# Altium PCB PCBGroupie.PcbDoc
Units mm, origin at the board's own origin, x right, y up, seen from the top; angles counter-clockwise.
Board outline 81.5 x 52.25 mm, 2 copper layers (Top Layer, Bottom Layer), stack 1.57 mm thick; 33 components, 36 nets, 132 pads, 2 vias.
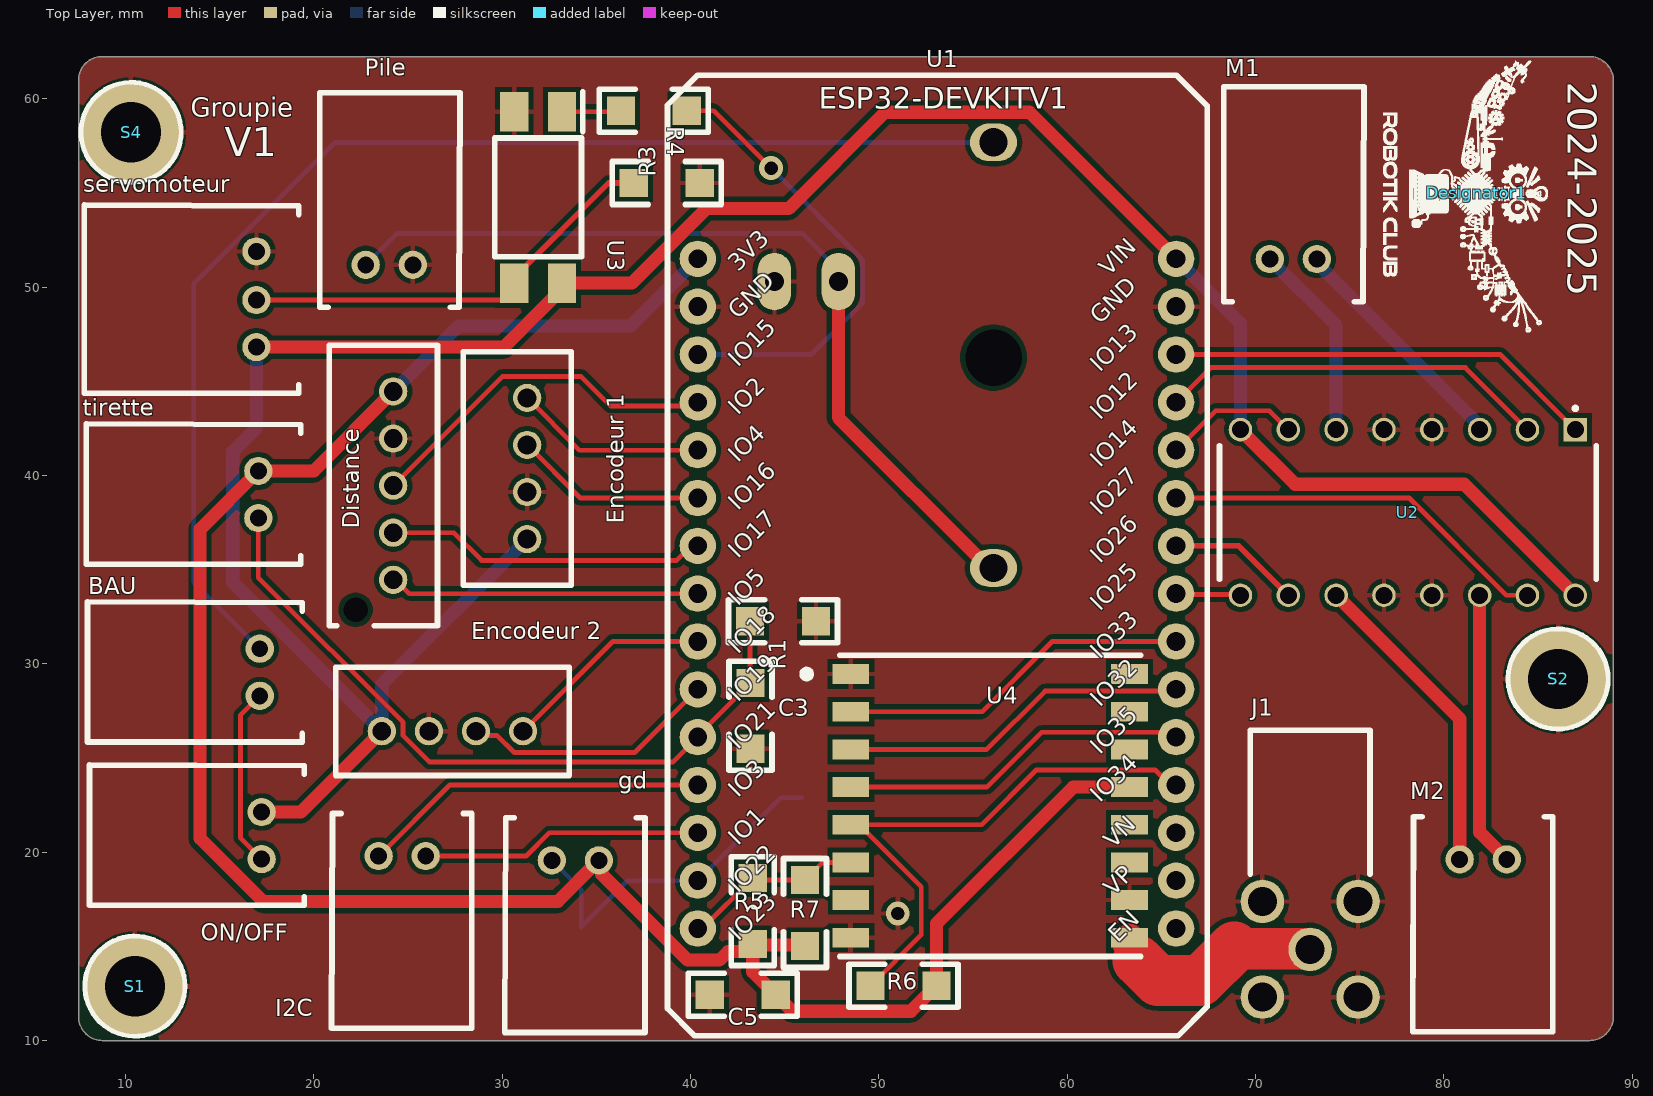
[diagram p0: Top Layer view]
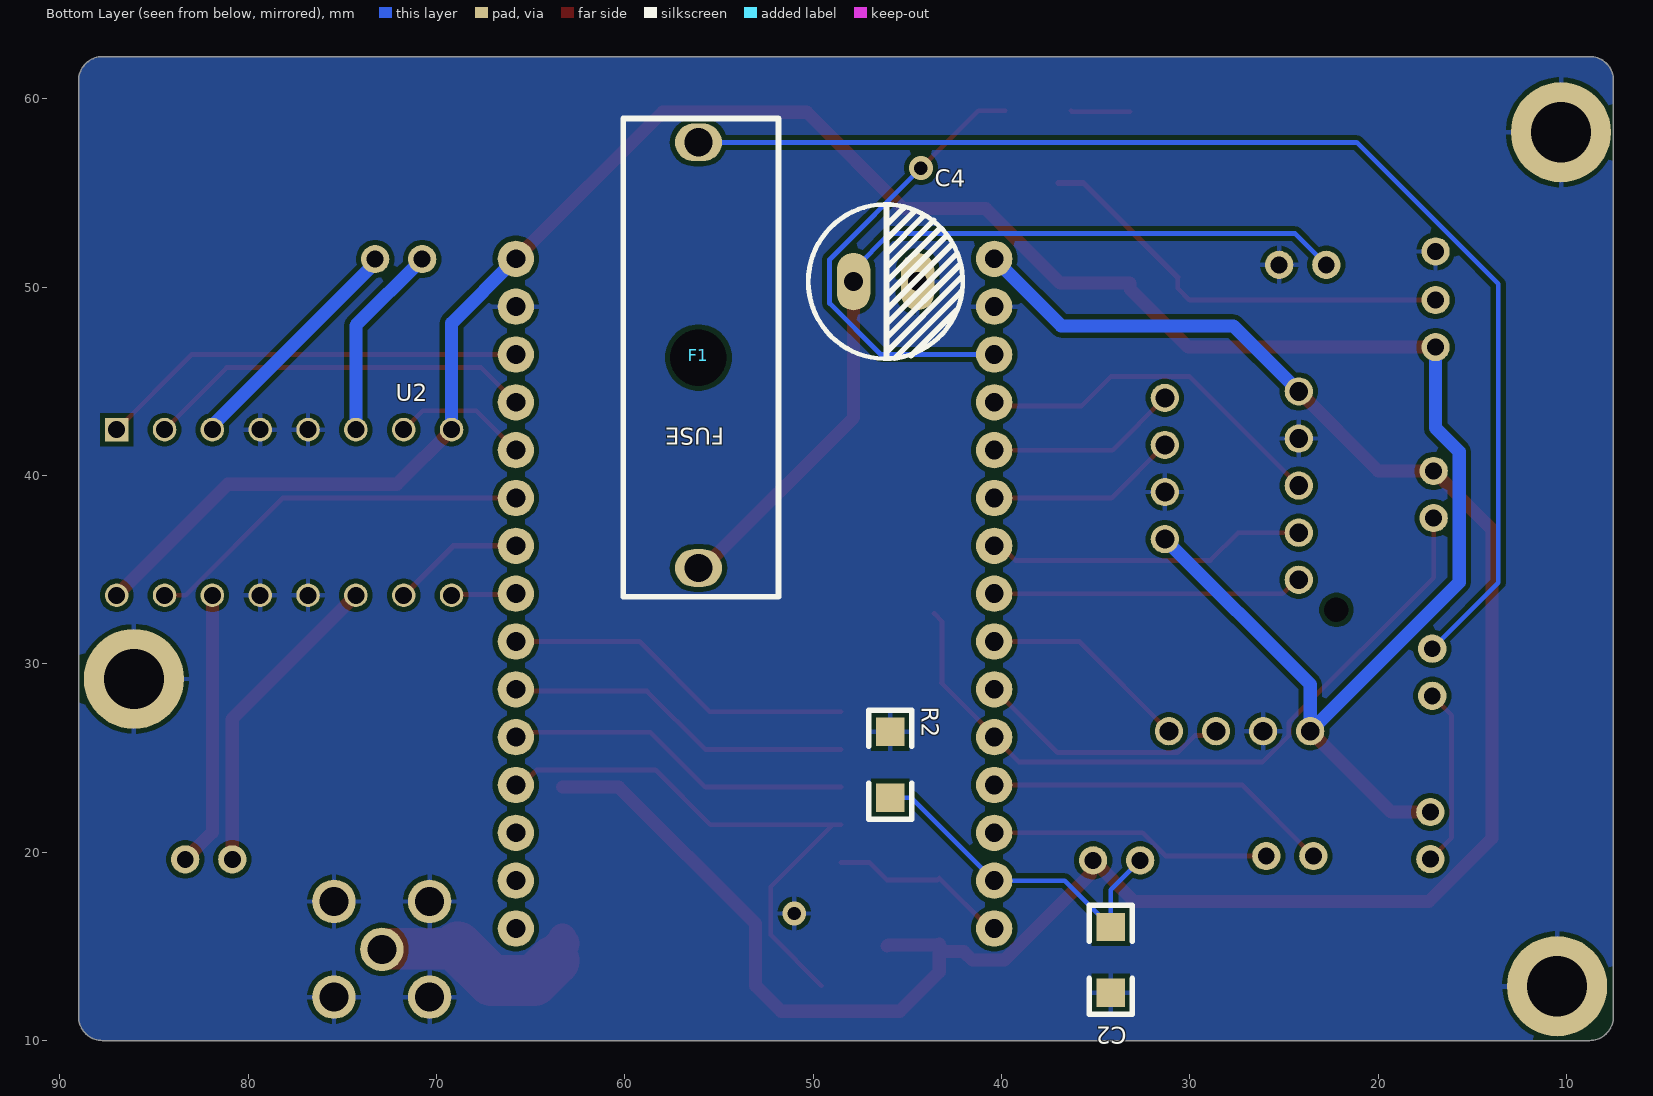
[diagram p1: Bottom Layer view, seen from below]

## Layer stack, top to bottom
Top Solder: solder mask 0.01, Solder Resist, Dk 3.5
Top Layer: signal copper 0.035
Dielectric 1: dielectric 1.5, FR-4, Dk 4.8
Bottom Layer: signal copper 0.035
Bottom Solder: solder mask 0.01, Solder Resist, Dk 3.5

## Board outline
7.5,11.27 7.5,61 cw(c8.75,61) 8.75,62.25 87.73,62.25 cw(c87.73,60.98) 89,60.98 89,11.27 cw(c87.73,11.27) 87.73,10 8.77,10 cw(c8.77,11.27)

## Design rules (kind name [scope] priority, off if disabled: settings)
Clearance [All] p1: gap=0.254 ignorepadtopadclearanceinfootprint=FALSE
PolygonConnect [All] p1: connectstyle=Relief reliefconductorwidth=0.254 reliefentries=4 polygonreliefangle="90 Angle" airgapwidth=0.254
RoutingVias [All] p1: holewidth=0.711 width=1.27 viastyle="Through Hole" minholewidth=0.711 minwidth=1.27 maxholewidth=0.711 maxwidth=1.27
SolderMaskExpansion [All] p1: expansion=0.102 istentingtop=FALSE
SupplyNets "Schematic Supply Nets_3" [InNet('VCC')] p1: voltage=0.000
SupplyNets "Schematic Supply Nets_2" [InNet('3V')] p2: voltage=0.000
SupplyNets "Schematic Supply Nets_1" [InNet('GND')] p3: voltage=0.000
Width "VCC width" [InNet('VCC')] p1: maxlimit=0.7 minlimit=0.254 preferedwidth=0.7 minimp=50.000000 maximp=50.000000 favimp=50.000000
Width "3V width" [InNet('3V')] p2: maxlimit=0.7 minlimit=0.254 preferedwidth=0.7 minimp=50.000000 maximp=50.000000 favimp=50.000000
30 further rules are at their usual default settings.

## Components (designator, comment, footprint, x,y, rotation, side; value= is the part's Value field where it differs from the comment)
BAU "" S2B-XH-A 17.12,28.307 r90 top
C2 "Cap" "Capacitor 1206" 34.188,14.286 r90 bottom value=1µF
C3 "Cap" "Capacitor 1206" 43.18,27.24 r90 top value=1µF
C4 "35V" Condensateur 47.85,50.303 r180 bottom value=100uF
C5 "Cap" "Capacitor 1206" 42.769,12.432 r180 top value=10µF
Designator1 "Comment" Logo_lowres 81.744,55.009 r270 top
Distance "Header 5" B5BXHAMLFSN 24.206,34.468 r90 top
"Encodeur 1" "" B4BXHALFSN 31.318,36.627 r90 top
"Encodeur 2" "" B4BXHALFSN 23.6,26.427 r0 top
F1 "2A" Fuse 56.083,57.695 r270 bottom
gd "" S2B-XH-A 35.128,19.569 r180 top
I2C "" S2B-XH-A 25.933,19.798 r180 top
J1 "0731000114" 0731000114 72.898,14.845 r270 top
M1 "M1" S2B-XH-A 70.754,51.497 r0 top
M2 "M2" S2B-XH-A 83.337,19.62 r180 top
ON/OFF "" S2B-XH-A 17.221,19.635 r90 top
Pile "" S2B-XH-A 22.748,51.192 r0 top
R1 "Res2" "Resistor 1206" 44.907,32.269 r180 top value=10K
R2 "Res2" "Resistor 1206" 45.898,24.649 r270 bottom value=10K
R3 "Res2" "Resistor 1206" 38.049,59.371 r180 top value=150
R4 "Res2" "Resistor 1206" 38.735,55.536 r180 top value=10K
R5 "Res2" "Resistor 1206" 43.302,16.877 r90 top value=10K
R6 "Res2" "Resistor 1206" 51.303,12.915 r180 top value=10K
R7 "Res2" "Resistor 1206" 46.071,16.775 r90 top value=10K
S1 "Screw M3" "Screw M3" 10.49,12.889 r0 top
S2 "Screw M3" "Screw M3" 86.062,29.202 r0 top
S4 "Screw M3" "Screw M3" 10.287,58.228 r0 top
servomoteur "S3B-XH-A" S3B-XH-A 16.942,46.824 r90 top
tirette "" S2B-XH-A 17.043,37.745 r90 top
U1 "ESP32-DEVKITC-32D" MODULE_ESP32-DEVKITV1 53.081,36.511 r0 top
U2 "L293D" DIP880W50P254L2000H510Q16 78.087,38.042 r270 top
U3 "FOD817S" SOP254P1016X385-4N 31.902,54.774 r270 top
U4 "RFM95W-868S2" XCVR_RFM95W-868S2 55.909,22.461 r0 top

## Footprints (in the part's own frame and the unit in brackets; to place one, negate y for a bottom-side part, rotate by r counter-clockwise, add the part's x,y. Pads: shape width x height; smd on the part's side, far side on the other; paste and mask are expansions set on the pad)
0731000114 [mm]
  round 2.31 hole 1.54: 1(0,0) 2(2.54,2.54) 3(-2.54,2.54) 4(-2.54,-2.54) 5(2.54,-2.54)
  silkscreen extent -11.63,-3.18 -4,3.17, body extent -11.63,-3.21 3.21,3.21, height 9.67
B4BXHALFSN [mm]
  round 1.5 hole 1: 1(0,0) 2(2.5,0) 3(5,0) 4(7.5,0)
  silkscreen extent -2.45,-2.35 9.95,3.4, body extent -2.45,-2.35 9.95,3.4, height 7.52
B5BXHAMLFSN [mm]
  round 1.5 hole 1: 1(0,0) 2(2.5,0) 3(5,0) 4(7.5,0) 5(10,0)
  round 0.65 hole 1.3 unplated: MH1(-1.6,2)
  silkscreen extent -2.45,-2.35 12.45,3.4, body extent -2.45,-2.36 12.45,3.39, height 6.92
"Capacitor 1206" [mm]
  rect 1.5x1.5 smd: 1(-1.75,0) 2(1.75,0)
  silkscreen extent -2.89,-1.14 2.89,1.14, body extent -1.97,-0.99 1.97,0.96, height 1.3
Condensateur [mil]
  oval 70x120 hole 40: 1(0,0) 2(133.86,0)
  silkscreen extent -94,-161 228,161, body extent -93,-160 227,160, height 500
DIP880W50P254L2000H510Q16 [mm]
  rect 1.25x1.25 / inner round 1.25 / far side rect 1.25x1.25 hole 0.9: 1(-4.4,8.89)
  round 1.25 hole 0.9: 2(-4.4,6.35) 3(-4.4,3.81) 4(-4.4,1.27) 5(-4.4,-1.27) 6(-4.4,-3.81) 7(-4.4,-6.35) 8(-4.4,-8.89) 9(4.4,-8.89) 10(4.4,-6.35) 11(4.4,-3.81) 12(4.4,-1.27) 13(4.4,1.27) 14(4.4,3.81) 15(4.4,6.35) 16(4.4,8.89)
  silkscreen extent -5.62,-10 3.55,10, body extent -10,-4.62 10,4.62, height 5.1
Fuse [mm] "Porte-fusible monté sur circuit 10 (UL) A, 6.3 (VDE) A, fusible Cartouche, 893-0574"
  round 2 hole 3: 0(11.43,0)
  oval 2x2.5 hole 1.5: 1(0,0) 2(22.6,0)
  silkscreen extent -1.27,-4 24.13,4.25, body extent -1.27,-4.29 24.13,4.29, height 11.41
Logo_lowres [mm]
  silkscreen extent -7.01,-4.93 7.39,3.76
MODULE_ESP32-DEVKITV1 [mm]
  round 1.93 / inner round 1.524 / far side round 1.93 hole 1: 1(-12.7,15) 2(-12.7,12.46) 3(-12.7,9.92) 4(-12.7,7.38) 5(-12.7,4.84) 6(-12.7,2.3) 7(-12.7,-0.24) 8(-12.7,-2.78) 9(-12.7,-5.32) 10(-12.7,-7.86) 11(-12.7,-10.4) 12(-12.7,-12.94) 13(-12.7,-15.48) 14(-12.7,-18.02) 15(-12.7,-20.56) 16(12.7,-20.56) 17(12.7,-18.02) 18(12.7,-15.48) 19(12.7,-12.94) 20(12.7,-10.4) 21(12.7,-7.86) 22(12.7,-5.32) 23(12.7,-2.78) 24(12.7,-0.24) 25(12.7,2.3) 26(12.7,4.84) 27(12.7,7.38) 28(12.7,9.92) 29(12.7,12.46) 30(12.7,15)
  silkscreen extent -14.31,-26.26 14.35,24.75, body extent -14.22,-26.09 14.28,24.84, height 7.2
"Resistor 1206" [mm]
  rect 1.5x1.5 smd: 1(-1.75,0) 2(1.75,0)
  silkscreen extent -2.89,-1.14 2.89,1.14, body extent -1.98,-0.95 1.98,0.93, height 0.55
S2B-XH-A [mm]
  round 1.5 hole 0.9: 1(0,0) 2(2.5,0)
  silkscreen extent -2.45,-2.26 5,9.14, body extent -2.41,-2.32 4.99,9.18, height 6.15
S3B-XH-A [mm]
  round 1.5 hole 0.9: 1(0,0) 2(2.5,0) 3(5.08,0)
  silkscreen extent -2.45,-2.26 7.54,9.14, body extent -2.44,-2.27 7.46,9.23, height 6.15
"Screw M3" [mm] "M3 iso Screw"
  round 5.32 hole 3.2 unplated: 0(0,0)
  silkscreen extent -2.66,-2.66 2.66,2.66
SOP254P1016X385-4N [mm]
  rect 2.1x1.5 smd: 1(-4.55,1.27) 2(-4.55,-1.27) 3(4.55,-1.27) 4(4.55,1.27)
  silkscreen extent -5.6,-2.3 3.15,2.37, body extent -5.08,-2.3 5.08,2.3, height 3.85
XCVR_RFM95W-868S2 [mm]
  rect 1.95x1.05 smd: 1(-7.4,7) 2(-7.4,5) 3(-7.4,3) 4(-7.4,1) 5(-7.4,-1) 6(-7.4,-3) 7(-7.4,-5) 8(-7.4,-7) 9(7.4,-7) 10(7.4,-5) 11(7.4,-3) 12(7.4,-1) 13(7.4,1) 14(7.4,3) 15(7.4,5) 16(7.4,7)
  silkscreen extent -10.04,-8 8,8, body extent -8,-8 8,8, height 1.8

## Part data
BAU gd I2C M1 M2 ON/OFF Pile tirette: library part "Header 2H", "Header, 2-Pin, Right Angle", LatestRevisionDate=17-Jul-2002, LatestRevisionNote="Re-released for DXP Platform.", Publisher="Altium Limited"
C2 C3 C5: "Capacitor", LatestRevisionDate=17-Jul-2002, LatestRevisionNote="Re-released for DXP Platform.", PackageDescription="Radial Cap, Thru-Hole; 2 Leads; 0.3 in Pin Spacing", PackageReference=RAD-0.3, Published=8-Jun-2000, Publisher="Altium Limited"
C4: library part "Cap Pol1", "Polarized Capacitor (Radial)", LatestRevisionDate=17-Jul-2002, LatestRevisionNote="Re-released for DXP Platform.", PackageDescription="Polarized Capacitor (Radial); 2 Leads", PackageReference=RB7.6-15, Published=8-Jun-2000, Publisher="Altium Limited"
Distance: "Header, 5-Pin", LatestRevisionDate=17-Jul-2002, LatestRevisionNote="Re-released for DXP Platform.", Publisher="Altium Limited"
"Encodeur 1" "Encodeur 2": library part "Header 4H", "Header, 4-Pin, Right Angle", LatestRevisionDate=17-Jul-2002, LatestRevisionNote="Re-released for DXP Platform.", Publisher="Altium Limited"
F1: library part "Fuse 2", "Fuse", LatestRevisionDate=17-Jul-2002, LatestRevisionNote="Re-released for DXP Platform.", PackageDescription="Thru-Hole; 2 Leads", PackageReference=PIN-W2/E2.8, Published=8-Jun-2000, Publisher="Altium Limited"
J1: "Connector", Manufacturer_Name=Molex, Mouser Part Number=N/A, Arrow Part Number=0731000114, Arrow Price/Stock=https://www.arrow.com/en/products/0731000114/molex?region=europe, Datasheet Link=https://www.molex.com/pdm_docs/sd/731000114_sd.pdf, Height=9.57mm, Manufacturer_Part_Number=0731000114, Mouser Price/Stock=https://www.mouser.co.uk/ProductDetail/Molex/0731000114?qs=PBcRNPEHKspjQWXqYv3LPw%3D%3D
R1 R2 R3 R4 R5 R6 R7: "Resistor", LatestRevisionDate=17-Jul-2002, LatestRevisionNote="Re-released for DXP Platform.", PackageDescription="Axial Device, Thru-Hole; 2 Leads; 0.4 in Pin Spacing", PackageReference=AXIAL-0.4, Published=8-Jun-2000, Publisher="Altium Limited"
servomoteur: library part "Header 3H", "Header, 3-Pin, Right Angle", LatestRevisionDate=17-Jul-2002, LatestRevisionNote="Re-released for DXP Platform.", Publisher="Altium Limited"
U1: "Eval Board For Esp-Wroom-32", Package=None, Availability=Unavailable, MF="Espressif Systems", MP=ESP32-DEVKITC-32D, Price=None, SnapEDA_Link=https://www.snapeda.com/parts/ESP32-DEVKITC-32D/Espressif%20Systems/view-part/?ref=snap
U2: "Bipolar Motor Driver - Parallel 16-PowerDIP", Package="DIP-16 STMicroelectronics", Availability="In Stock", Check_prices=https://www.snapeda.com/parts/L293D/STMicroelectronics/view-part/?ref=eda, MF=STMicroelectronics, MP=L293D, Price=None, Purchase-URL=https://pricing.snapeda.com/search/part/L293D/?ref=eda, SnapEDA_Link=https://www.snapeda.com/parts/L293D/STMicroelectronics/view-part/?ref=snap
U3: library part Optoisolator1, "4-Pin Phototransistor Optocoupler", DatasheetVersion=Nov-2003, LatestRevisionDate=04-Mar-2005, LatestRevisionNote="Sch pins 3 & 4 Swapped.", PackageReference=DIP-4, Published=24-Mar-1999, Publisher="Altium Limited"
U4: "General ISM < 1GHz LoRaâ„¢ Transceiver Module 868MHz Antenna Not Included Surface Mount", Package="Non Standard RF Solutions", Availability="In Stock", Check_prices=https://www.snapeda.com/parts/RFM95W-868S2/RF+Solutions/view-part/?ref=eda, MF=RF, MP=RFM95W-868S2, Price=None, Purchase-URL=https://pricing.snapeda.com/search?q=RFM95W-868S2&ref=eda, SnapEDA_Link=https://www.snapeda.com/parts/RFM95W-868S2/RF+Solutions/view-part/?ref=snap

## Via types
v1: diameter 1.27, hole 0.711, Top Layer to Bottom Layer, 2 vias

## Nets (pads, with @x,y where several pads share a name; then routed paths per layer and width w, separated by ;. In a path a pad name is that pad's centre, name@x,y a point inside that pad or via, vN(x,y) a via of type N, cw(c..) or ccw(c..) an arc to the next point about the centre after c; other vN are vias at no path point)
3V: C5.1 Distance.5 gd.1 R5.1 R6.1 R7.1 tirette.2 U1.1 U4.13 | length 115.4
  Top Layer w0.7: Distance.5 19.983,40.245 tirette.2 13.952,37.154 13.952,20.73 17.297,17.385 32.944,17.385 gd.1 35.281,19.416 35.281,18.832 39.84,14.273 41.532,14.273 41.986,14.727 43.004,14.727 R5.1@43.353,15.076 ; R7.1 46.02,15.076 R5.1@43.353,15.076 ; U4.13 60.312,23.461 53.053,16.202 R6.1 51.699,11.561 45.39,11.561 C5.1 43.302,13.649 R5.1 R5.1@43.353,15.076
  Bottom Layer w0.7: Distance.5 27.686,47.949 36.818,47.949 U1.1
cs_lora: R6.2 U1.19 U4.5 | length 29.8
  Top Layer w0.254: U4.5 U4.5@48.959,21.461 ; R6.2 52.25,15.612 52.25,18.17 U4.5@48.959,21.461 ; U1.19 65.469,23.571 64.673,24.367 58.352,24.367 55.446,21.461 U4.5@48.959,21.461
"enable 1": U1.28 U2.1 | length 22.8
  Top Layer w0.254: U1.28 82.987,46.431 U2.1
"enable 2": U1.23 U2.9 | length 3.5
  Top Layer w0.254: U1.23 65.826,33.686 69.152,33.686 U2.9
ESP_PWM: R3.1 U1.3 | length 24.8
  Top Layer w0.254: R3.1 41.224,59.371 v1(44.272,56.323)
  Bottom Layer w0.254: U1.3 46.409,46.431 49.12,49.142 49.12,51.475 v1(44.272,56.323)
GND: "Encodeur 1.2" "Encodeur 2.2" C2.1 C3.1 C4.2 C5.2 Distance.4 J1.2 J1.3 J1.4 J1.5 Pile.2 R1.1 R2.1 R4.1 S1.0 S2.0 S4.0 servomoteur.3 U1.2 U1.29 U2.4 U2.5 U2.12 U2.13 U3.2 U4.1 U4.8 U4.10
  other v1: 51,16.75
I2C_INT: Distance.3 U1.4 | length 19.3
  Top Layer w0.254: Distance.3 29.996,45.258 34.186,45.258 35.754,43.691 40.181,43.691 U1.4
I2C_LPN: Distance.1 U1.8 | length 16.5
  Top Layer w0.254: Distance.1 24.331,34.468 25.068,33.731 U1.8
I2C_RST: Distance.2 U1.7 | length 17.1
  Top Layer w0.254: Distance.2 27.429,36.968 28.901,35.496 39.252,35.496 40.027,36.271 U1.7
I2C_SCL: I2C.2 U1.12 | length 18.5
  Top Layer w0.254: I2C.2 27.207,23.571 U1.12
I2C_SDA: I2C.1 U1.13 | length 15
  Top Layer w0.254: I2C.1 31.257,19.798 32.491,21.031 U1.13
miso_lora: U1.22 U4.2 | length 18.8
  Top Layer w0.254: U4.2 55.477,27.461 59.207,31.191 U1.22
mosi_lora: U1.21 U4.3 | length 18.6
  Top Layer w0.254: U4.3 55.729,25.461 58.823,28.555 65.685,28.555 U1.21
NetBAU_1: BAU.1 ON/OFF.1 | length 9.6
  Top Layer w0.254: BAU.1 16.09,27.278 16.09,20.766 ON/OFF.1
NetBAU_2: BAU.2 F1.1 | length 66.4
  Bottom Layer w0.254: BAU.2 13.614,34.312 13.614,50.176 21.134,57.695 F1.1
NetC4_1: C4.1 F1.2 Pile.1 | length 46.4
  Top Layer w0.254: Pile.1@22.479,51.472 22.479,51.461 Pile.1
  Top Layer w0.7: C4.1 47.85,43.078 55.833,35.095 F1.2
  Bottom Layer w0.254: Pile.1 24.413,52.857 45.931,52.857 47.85,50.938 C4.1
"NetEncodeur 1_3": "Encodeur 1.3" U1.6 | length 10.2
  Top Layer w0.254: 31.318,41.627 34.134,38.811 U1.6
"NetEncodeur 1_4": "Encodeur 1.4" U1.5 | length 10.2
  Top Layer w0.254: 31.318,44.127 34.094,41.351 U1.5
"NetEncodeur 2_3": "Encodeur 2.3" U1.10 | length 13.6
  Top Layer w0.254: 28.6,26.427 28.831,26.197 29.731,26.197 30.632,25.296 37.026,25.296 U1.10
"NetEncodeur 2_4": "Encodeur 2.4" U1.9 | length 11.3
  Top Layer w0.254: 31.1,26.427 35.864,31.191 U1.9
NetJ1_1: J1.1 U4.9 | length 13
  Top Layer w1.5: U4.9@63.309,15.161 U4.9
  Top Layer w1.8: U4.9@63.309,15.161 63.759,14.711 63.759,14.242
  Top Layer w2.1: 71.72,14.845 J1.1
  Top Layer w2.2: 68.864,14.977 69.218,14.977 69.319,14.876 72.789,14.876 72.799,14.866 72.877,14.866 J1.1
  Top Layer w2.7: 63.759,14.242 64.813,13.187 67.075,13.187 68.864,14.977
NetM1_1: M1.1 U2.6 | length 10.5
  Bottom Layer w0.7: M1.1 74.277,47.974 U2.6
NetM1_2: M1.2 U2.3 | length 12.7
  Top Layer w0.7: M1.2@73.254,51.462 M1.2
  Bottom Layer w0.7: M1.2 73.254,51.291 81.897,42.648 U2.3
NetM2_1: M2.1 U2.14 | length 14.6
  Top Layer w0.7: U2.14 81.897,21.061 M2.1
NetM2_2: M2.2 U2.11 | length 16.7
  Top Layer w0.7: U2.11 80.837,27.081 M2.2
NetR3_2: R3.2 U3.1 | length 3.1
  Top Layer w0.254: U3.1 36.252,59.324 R3.2
OPT_PWM: R4.2 servomoteur.2 U3.3 | length 23
  Top Layer w0.254: servomoteur.2 30.009,49.324 30.632,49.947 U3.3 U3.3@30.632,50.524
  Top Layer w0.3: U3.3@30.632,50.524 35.644,55.536 R4.2
reset_lora: R5.2 R7.2 U1.15 U4.6 | length 9.7
  Top Layer w0.254: U1.15 40.626,15.951 R5.2 43.404,18.525 R7.2 47.006,19.461 U4.6
sck_lora: U1.20 U4.4 | length 18.6
  Top Layer w0.254: U4.4 55.729,23.461 58.635,26.367 65.525,26.367 U1.20
"Sens1 M1": U1.27 U2.2 | length 20.8
  Top Layer w0.254: U1.27 67.628,45.738 81.14,45.738 U2.2
"Sens1 M2": U1.24 U2.10 | length 7
  Top Layer w0.3: U1.24 69.107,36.271 U2.10
"Sens2 M1": U1.26 U2.7 | length 7.2
  Top Layer w0.254: U1.26 67.877,43.448 70.731,43.448 U2.7
"Sens2 M2": U1.25 U2.15 | length 20.8
  Top Layer w0.254: U1.25 78.15,38.811 83.319,33.642 U2.15
switch_gd: C2.2 gd.2 R2.2 U1.14 | length 18.7
  Bottom Layer w0.254: gd.2 34.188,18.009 C2.2 36.643,18.491 U1.14 44.789,22.899 R2.2
tirette: C3.2 R1.2 tirette.1 U1.11 | length 39.4
  Top Layer w0.254: tirette.1 17.043,34.584 24.731,26.896 24.731,26.197 26.14,24.788 39.058,24.788 U1.11 40.381,26.191 C3.2 43.157,29.013 R1.2 R1.2@43.572,32.685
VCC: "Encodeur 1.1" "Encodeur 2.1" ON/OFF.2 servomoteur.1 U1.30 U2.8 U2.16 U3.4 | length 135.1
  Top Layer w0.7: servomoteur.1 30.072,46.824 33.172,49.924 U3.4 36.874,50.224 40.832,54.182 45.203,54.182 50.32,59.299 57.993,59.299 U1.30 ; ON/OFF.2 19.308,22.135 23.6,26.427 ; U2.8 72.096,39.542 81.076,39.542 U2.16
  Bottom Layer w0.7: servomoteur.1 16.942,42.522 15.689,41.269 15.689,34.338 23.6,26.427 23.6,28.91 31.318,36.627 ; U1.30 69.197,48.096 U2.8
pads on no net: Distance.MH1 F1.0 U1.16 U1.17 U1.18 U4.7 U4.11 U4.12 U4.14 U4.15 U4.16

## Polygon pours and split planes (outlines as drawn)
GND on Bottom Layer "GND_L02_P001" (solid, pour order 1): 7.5,11.27 7.5,61 cw(c8.75,61) 8.75,62.25 87.73,62.25 cw(c87.73,60.98) 89,60.98 89,11.27 cw(c87.73,11.27) 87.73,10 8.77,10 cw(c8.77,11.27)
GND on Top Layer "GND_L01_P002" (solid, pour order 2): 7.5,11.27 7.5,61 cw(c8.75,61) 8.75,62.25 87.73,62.25 cw(c87.73,60.98) 89,60.98 89,11.27 cw(c87.73,11.27) 87.73,10 8.77,10 cw(c8.77,11.27)

## Silkscreen, mask and mechanical layers (free items; w line width, h text height)
Top Overlay:
  text "2024-2025" at 86.57,60.927 h1.52 r270
  text "Groupie" at 13.455,59.045 h1
  text "V1" at 15.254,56.955 h1.52
Mechanical 1:
  the board outline again, w0.254

## Text inside footprints (layer, text, board x,y; h text height)
F1: Bottom Overlay "FUSE" at 54.712,42.842 h1.52 r180
U1: Top Overlay "EN" at 62.931,14.921 h1.57 r45; Top Overlay "VP" at 62.681,17.391 h1.57 r45; Top Overlay "VN" at 62.681,19.931 h1.57 r45; Top Overlay "IO34" at 61.961,22.361 h1.57 r45; Top Overlay "IO35" at 61.961,24.901 h1.57 r45; Top Overlay "IO32" at 61.961,27.441 h1.57 r45; Top Overlay "IO33" at 61.961,29.981 h1.57 r45; Top Overlay "IO25" at 61.961,32.521 h1.57 r45; Top Overlay "IO26" at 61.961,35.061 h1.57 r45; Top Overlay "IO27" at 61.961,37.601 h1.57 r45; Top Overlay "IO14" at 61.961,40.141 h1.57 r45; Top Overlay "IO12" at 61.961,42.681 h1.57 r45; Top Overlay "IO13" at 61.961,45.221 h1.57 r45; Top Overlay "GND" at 61.961,47.761 h1.57 r45; Top Overlay "VIN" at 62.451,50.311 h1.57 r45; Top Overlay "IO23" at 42.763,14.999 h1.57 r45; Top Overlay "IO22" at 42.751,17.551 h1.57 r45; Top Overlay "IO1" at 42.751,20.091 h1.57 r45; Top Overlay "IO3" at 42.751,22.631 h1.57 r45; Top Overlay "IO21" at 42.751,25.171 h1.57 r45; Top Overlay "IO19" at 42.751,27.711 h1.57 r45; Top Overlay "IO18" at 42.751,30.251 h1.57 r45; Top Overlay "IO5" at 42.751,32.791 h1.57 r45; Top Overlay "IO17" at 42.751,35.331 h1.57 r45; Top Overlay "IO16" at 42.751,37.871 h1.57 r45; Top Overlay "IO4" at 42.751,40.411 h1.57 r45; Top Overlay "IO2" at 42.751,42.951 h1.57 r45; Top Overlay "IO15" at 42.751,45.491 h1.57 r45; Top Overlay "GND" at 42.751,48.031 h1.57 r45; Top Overlay "3V3" at 42.751,50.571 h1.57 r45; Top Overlay "ESP32-DEVKITV1" at 46.791,59.081 h1.97